# Altium PCB DebugBoard.PcbDoc
Units mil, origin at the board's own origin, x right, y up, seen from the top; angles counter-clockwise.
Board outline 2401.57 x 4330.71 mil, 4 copper layers (Top Layer, Layer 1, Layer 2, Bottom Layer), stack 70.112 mil thick; 162 components, 98 nets, 496 pads, 16 vias.
Unrouted connection lines stored in the file: 369.
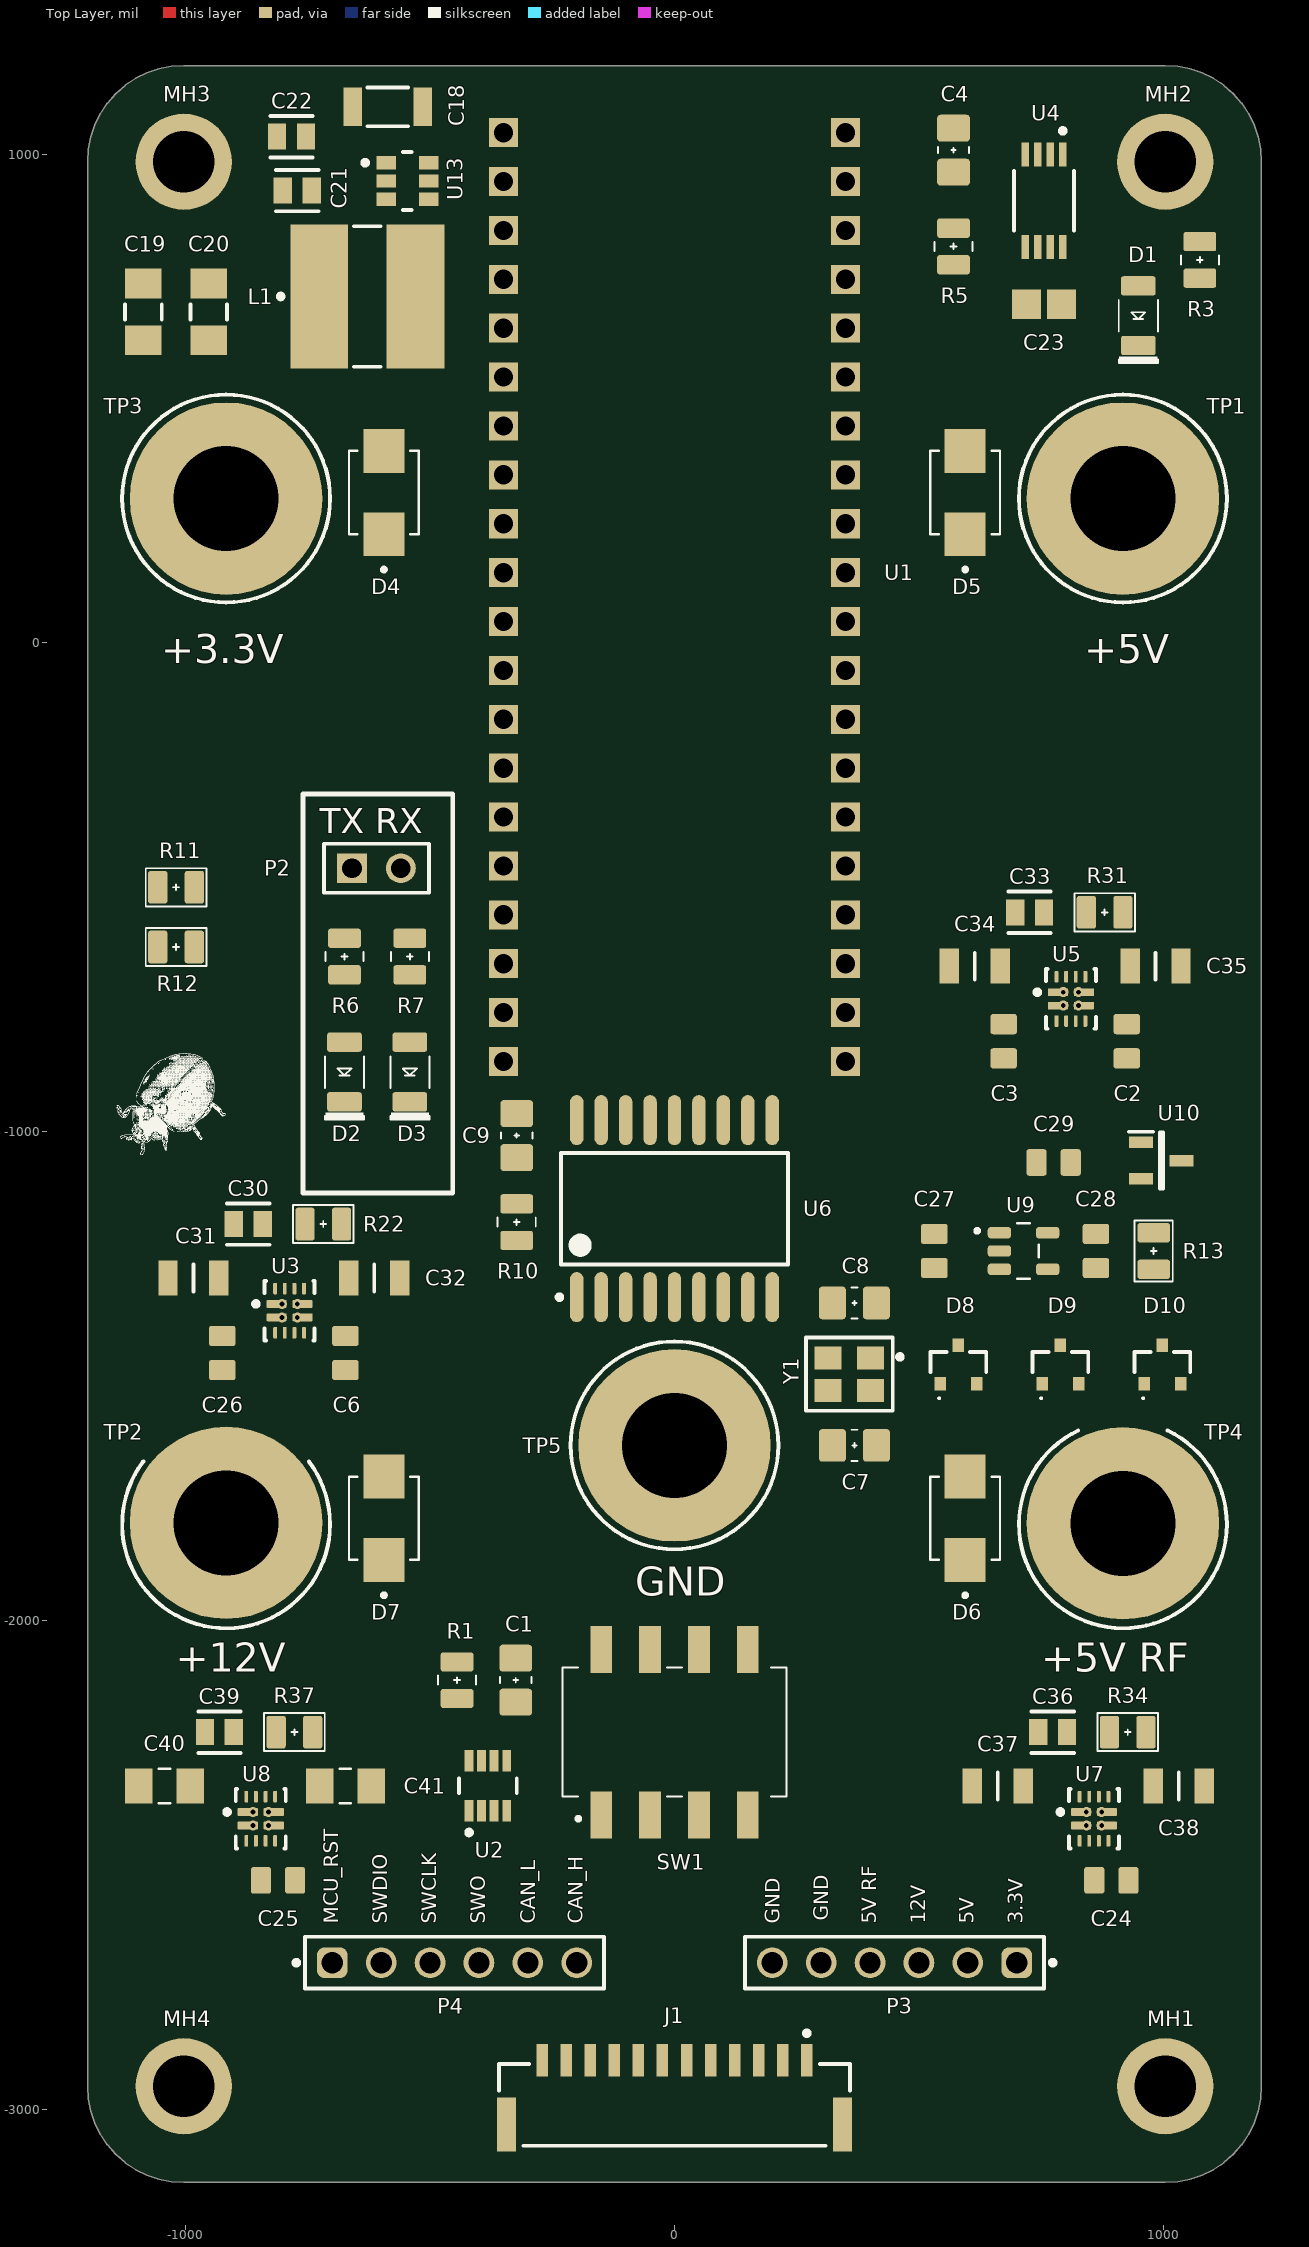
[diagram p0: Top Layer view]
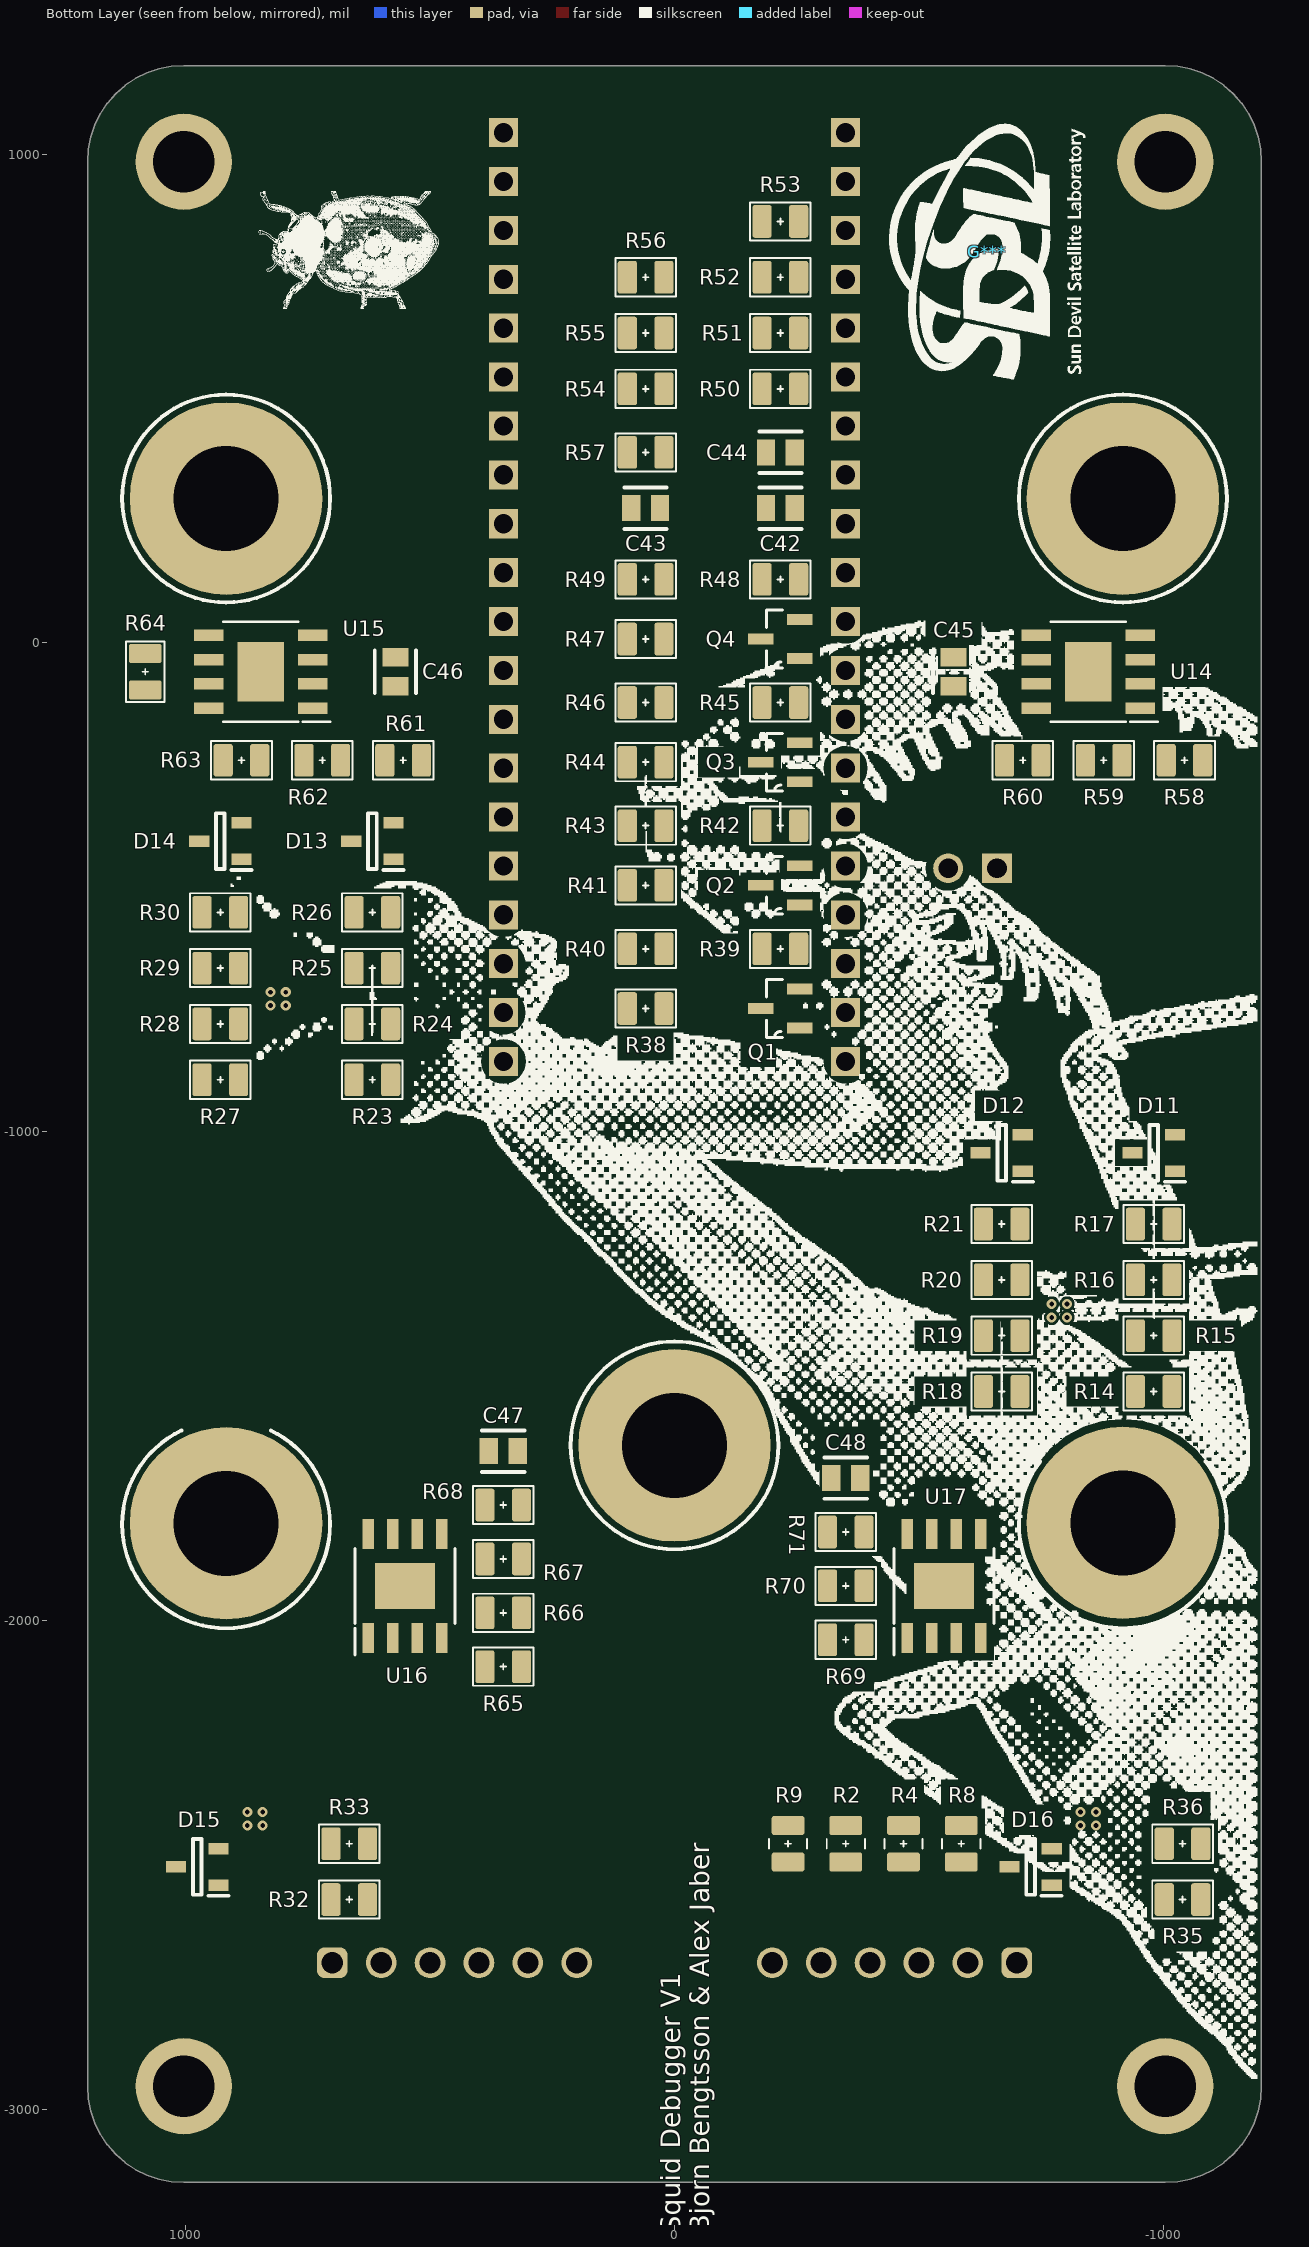
[diagram p1: Bottom Layer view, seen from below]

## Layer stack, top to bottom
Top Solder: solder mask 0.5, Solder Resist, Dk 3.3
Top Layer: signal copper 1.378
Dielectric 1: prepreg 2.8, PP-006, Dk 4.1
Layer 1: signal copper 1.378
Dielectric1: core 59, FR-4, Dk 4.3
Layer 2: signal copper 1.378
Dielectric 2: prepreg 2.8, PP-006, Dk 4.1
Bottom Layer: signal copper 1.378
Bottom Solder: solder mask 0.5, Solder Resist, Dk 3.3

## Board outline
1003.94,1181.15 -1003.94,1181.15 -1029.63,1179.47 -1054.89,1174.45 -1079.27,1166.17 -1102.36,1154.78 -1123.77,1140.48 -1143.13,1123.5 -1160.11,1104.14 -1174.41,1082.73 -1185.8,1059.63 -1194.08,1035.25 -1199.1,1010 -1200.79,984.3 -1200.79,-2952.7 -1199.1,-2978.4 -1194.08,-3003.65 -1185.8,-3028.04 -1174.41,-3051.13 -1160.11,-3072.54 -1143.13,-3091.9 -1123.77,-3108.88 -1102.36,-3123.18 -1079.27,-3134.57 -1054.89,-3142.85 -1029.63,-3147.87 -1003.94,-3149.56 1003.94,-3149.56 1029.63,-3147.87 1054.89,-3142.85 1079.27,-3134.57 1102.36,-3123.18 1123.77,-3108.88 1143.13,-3091.9 1160.11,-3072.54 1174.41,-3051.13 1185.8,-3028.04 1194.08,-3003.65 1199.1,-2978.4 1200.79,-2952.7 1200.79,984.3 1199.1,1010 1194.08,1035.25 1185.8,1059.63 1174.41,1082.73 1160.11,1104.14 1143.13,1123.5 1123.77,1140.48 1102.36,1154.78 1079.27,1166.17 1054.89,1174.45 1029.63,1179.47

## Design rules (kind name [scope] priority, off if disabled: settings)
Clearance [All] p1: gap=5 ignorepadtopadclearanceinfootprint=FALSE
DiffPairsRouting [All] p1: maxlimit=10 minlimit=10 mostfreqgap=10 toplayer_minwidth=10 toplayer_maxwidth=10 toplayer_prefwidth=10 midlayer1_minwidth=10 midlayer1_maxwidth=10 midlayer1_prefwidth=10 midlayer2_minwidth=10 midlayer2_maxwidth=10 midlayer2_prefwidth=10 bottomlayer_minwidth=10 bottomlayer_maxwidth=10 bottomlayer_prefwidth=10 maxuncoupledlength=500
HoleSize [All] p1: absolutevalues=TRUE maxlimit=500 minlimit=8 maxpercent=80.000 minpercent=20.000
MinimumAnnularRing [All] p1: minimumring=5
MinimumSolderMaskSliver [All] p1: minsoldermaskwidth=5
PasteMaskExpansion [All] p1: expansion=10
PlaneClearance [All] p1: clearance=15
PlaneConnect [All] p1: pad.planeconnectstyle=Relief pad.reliefexpansion=20 pad.reliefentries=4 pad.reliefconductorwidth=10 pad.reliefairgap=10 via.planeconnectstyle=Direct via.reliefexpansion=20 via.reliefentries=4 via.reliefconductorwidth=10 via.reliefairgap=10
PolygonConnect [All] p1: thpad.connectstyle=Direct thpad.reliefconductorwidth=10 thpad.reliefentries=4 thpad.polygonreliefangle="90 Angle" thpad.airgapwidth=10 smdpad.connectstyle=Relief smdpad.reliefconductorwidth=10 smdpad.reliefentries=4 smdpad.polygonreliefangle="90 Angle" smdpad.airgapwidth=10 via.connectstyle=Direct via.reliefconductorwidth=10 via.reliefentries=4 via.polygonreliefangle="90 Angle" via.airgapwidth=10
RoutingVias [All] p1: holewidth=12 width=24 viastyle="Through Hole" minholewidth=6 minwidth=12 maxholewidth=20 maxwidth=48
SMDNeckDown [All] p1: percent=120.000
SilkToSilkClearance [All] p1: silktosilkclearance=5
SilkToSolderMaskClearance SilkscreenOverComponentPads [IsPad] p1: minsilkscreentomaskgap=1 clearancetoexposedcopper=TRUE
SolderMaskExpansion [All] p1: expansion=10 istentingtop=FALSE
SupplyNets "Schematic Supply Nets_4" [InNet('+5V_LIM')] p1: voltage=0.000
SupplyNets "Schematic Supply Nets_2" [InNet('+5V_RF_LIM')] p2: voltage=0.000
SupplyNets "Schematic Supply Nets_1" [InNet('+3V3_LIM')] p3: voltage=0.000
SupplyNets "Schematic Supply Nets" [InNet('+12V_LIM')] p4: voltage=0.000
SupplyNets "Schematic Supply Nets_23" [InNet('+5V_PSU')] p5: voltage=0.000
SupplyNets "Schematic Supply Nets_22" [InNet('+3V3_USB')] p6: voltage=0.000
SupplyNets "Schematic Supply Nets_21" [InNet('VAUX')] p7: voltage=0.000
SupplyNets "Schematic Supply Nets_20" [InNet('+5V_RF_PSU')] p8: voltage=0.000
SupplyNets "Schematic Supply Nets_19" [InNet('+3V3_PSU')] p9: voltage=0.000
SupplyNets "Schematic Supply Nets_18" [InNet('+3V3_AUX')] p10: voltage=0.000
SupplyNets "Schematic Supply Nets_17" [InNet('+VBUS_PROT')] p11: voltage=0.000
SupplyNets "Schematic Supply Nets_16" [InNet('XREF_2V5')] p12: voltage=0.000
SupplyNets "Schematic Supply Nets_15" [InNet('+5V_TGT')] p13: voltage=0.000
SupplyNets "Schematic Supply Nets_14" [InNet('+3V3_TGT')] p14: voltage=0.000
SupplyNets "Schematic Supply Nets_13" [InNet('+12V_TGT')] p15: voltage=0.000
SupplyNets "Schematic Supply Nets_12" [InNet('+12V_PSU')] p16: voltage=0.000
SupplyNets "Schematic Supply Nets_11" [InNet('+5V_RF_TGT')] p17: voltage=0.000
SupplyNets "Schematic Supply Nets_10" [InNet('+3V3_RPI')] p18: voltage=0.000
SupplyNets "Schematic Supply Nets_9" [InNet('+VBUS')] p19: voltage=0.000
SupplyNets "Schematic Supply Nets_3" [InNet('GND')] p20: voltage=0.000
Width "2A Routing" [InNet('+5V','+12V','+5V BNN', '+5V RF', '+3.3V BNN', '+3.3V')] p1: maxlimit=55 minlimit=21 preferedwidth=55 toplayer_maxwidth=25 toplayer_prefwidth=25 midlayer1_minwidth=53 midlayer2_minwidth=53 bottomlayer_maxwidth=25 bottomlayer_prefwidth=25 minimp=50.000000 maximp=50.000000 favimp=50.000000
Width "1A Routing" [InNet('+3.3V RPI', '+VBUS', '+VBUS_O')] p2: maxlimit=25 minlimit=10 preferedwidth=25 toplayer_maxwidth=10 toplayer_prefwidth=10 midlayer1_minwidth=22 midlayer2_minwidth=22 bottomlayer_maxwidth=10 bottomlayer_prefwidth=10 minimp=50.000000 maximp=50.000000 favimp=50.000000
Width [All] p3: maxlimit=10 minlimit=10 preferedwidth=10
22 further rules are at their usual default settings.

## Classes and differential pairs
component class DebugBoardLimiters: C45 C46 C47 C48 R58 R59 R60 R61 R62 R63 R64 R65 R66 R67 R68 R69 R70 R71 U14 U15 U16 U17
component class DebugBoardPowerControl: C42 C43 C44 Q1 Q2 Q3 Q4 R38 R39 R40 R41 R42 R43 R44 R45 R46 R47 R48 R49 R50 R51 R52 R53 R54 R55 R56 R57 SW1
component class DebugBoardMuxes: C24 C25 C27 C28 C29 C36 C37 C38 C39 C40 C41 D4 D5 D6 D7 D8 D9 D10 D15 D16 R13 R32 R33 R34 R35 R36 R37 U7 U8 U9 U10
component class DebugBoard5VMux: C2 C3 C33 C34 C35 D13 D14 R23 R24 R25 R26 R27 R28 R29 R30 R31 U5
component class DebugBoard3V3Mux: C6 C26 C30 C31 C32 D11 D12 R14 R15 R16 R17 R18 R19 R20 R21 R22 U3
component class DebugBoard: C1 C4 C7 C8 C9 C18 C19 C20 C21 C22 C23 D1 D2 D3 J1 L1 MH1 MH2 MH3 MH4 P2 P3 P4 R1 R2 R3 R4 R5 R6 R7 R8 R9 R10 R11 R12 TP1 TP2 TP3 TP4 TP5 U1 U2 U4 U6 U13 Y1

## Components (designator, comment, footprint, x,y, rotation, side; value= is the part's Value field where it differs from the comment)
C1 "100nf" CAP_0805 -324.8,-2122 r90 top
C2 "1uF 25V" CAPC2012X135N 925.2,-814.91 r90 top
C3 "1uF 25V" CAPC2012X135N 673.23,-814.91 r90 top
C4 "100nf" CAP_0805 570.87,1007.93 r90 top
C6 "1uF 25V" CAPC2012X135N -673.23,-1452.7 r90 top
C7 "22pf" CAP_0805 368.11,-1641.68 r0 top
C8 "22pf" CAP_0805 368.11,-1350.34 r0 top
C9 "100nf" CAP_0805 -322.83,-1007.82 r90 top
C18 "10uf" FP-CGA5L-0_3-0_1-IPC_A -586.61,1096.51 r0 top
C19 "22uf" FP-GCM31C-0_2-e0_3_0_8-IPC_A -1086.61,677.22 r90 top
C20 "22uf" FP-GCM31C-0_2-e0_3_0_8-IPC_A -952.76,677.22 r90 top
C21 "0.1uF" FP-C0805C-DN-MFG -771.65,925.25 r0 top value="0.10 μF"
C22 "0.1uF" FP-C0805C-DN-MFG -783.46,1035.48 r0 top value="0.10 μF"
C23 "1 uF" CAPC2013X145X50ML20T25 755.91,692.96 r0 top value=1µF
C24 "1uF 25V" CAPC2012X135N 893.7,-2531.44 r0 top
C25 "1uF 50V" CAPC2012X135N -811.02,-2531.44 r0 top
C26 "1uF 25V" CAPC2012X135N -925.2,-1452.7 r90 top
C27 "1uF 50V" CAPC2012X135N 531.5,-1244.04 r90 top
C28 "1uF 25V" CAPC2012X135N 862.2,-1244.04 r90 top
C29 "1uF 25V" CAPC2012X135N 775.59,-1062.94 r0 top
C30 "100nF" FP-C0805C-DN-MFG -872.05,-1188.93 r0 top value="0.10 μF"
C31 "22uF 10V" CAPC3116X180N -984.25,-1299.16 r0 top
C32 "22uF 10V" CAPC3116X180N -614.17,-1299.16 r0 top
C33 "100nF" FP-C0805C-DN-MFG 726.38,-551.13 r0 top value="0.10 μF"
C34 "22uF 10V" CAPC3116X180N 614.17,-661.37 r0 top
C35 "22uF 10V" CAPC3116X180N 984.25,-661.37 r0 top
C36 "100nF" FP-C0805C-DN-MFG 773.62,-2228.3 r0 top value="0.10 μF"
C37 "22uF 10V" CAPC3116X180N 661.42,-2338.53 r0 top
C38 "22uF 10V" CAPC3116X180N 1031.5,-2338.53 r0 top
C39 "100nF" FP-C0805C-DN-MFG -931.1,-2228.3 r0 top value="0.10 μF"
C40 "10uF 35V" CAPC3216X190N -1043.31,-2338.53 r0 top
C41 "10uF 35V" CAPC3216X190N -673.23,-2338.53 r0 top
C42 "100nF" FP-C0805C-DN-MFG -216.54,275.64 r0 bottom value="0.10 μF"
C43 "100nF" FP-C0805C-DN-MFG 59.06,275.64 r0 bottom value="0.10 μF"
C44 "100nF" FP-C0805C-DN-MFG -216.54,389.81 r0 bottom value="0.10 μF"
C45 "100nF" FP-C0805C-DN-MFG -570.87,-59 r90 bottom value="0.10 μF"
C46 "100nF" FP-C0805C-DN-MFG 570.87,-59 r90 bottom value="0.10 μF"
C47 "100nF" FP-C0805C-DN-MFG 350.39,-1653.49 r0 bottom value="0.10 μF"
C48 "100nF" FP-C0805C-DN-MFG -350.39,-1708.61 r0 bottom value="0.10 μF"
D1 "LED_1206_RED" LED_1206_RED 948.82,669.38 r90 top
D2 "LED_1206_RED" LED_1206_RED -675.2,-877.86 r90 top
D3 "LED_1206_RED" LED_1206_RED -541.34,-877.86 r90 top
D4 "SMBJ5.0A" DIOM4336X265N -594.49,307.53 r90 top
D5 "SMBJ5.0A" DIOM4336X265N 594.49,307.53 r90 top
D6 "SMBJ5.0A" DIOM4336X265N 594.49,-1790.89 r90 top
D7 "SMBJ13A" DIOM4336X265N -594.49,-1790.89 r90 top
D8 "BAT54C" BAT54C215 580.71,-1476.33 r0 top
D9 "BAT54C" BAT54C215 789.37,-1476.33 r0 top
D10 "BAT54C" BAT54C215 998.03,-1476.33 r0 top
D11 "BZX84-C4V7" SOT95P230X110-3N -980.31,-1043.26 r0 bottom
D12 "BAT54A" SOT95P230X110-3N -669.29,-1043.26 r0 bottom
D13 "BZX84-C4V7" SOT95P230X110-3N 618.11,-405.46 r0 bottom
D14 "BAT54A" SOT95P230X110-3N 929.13,-405.46 r0 bottom
D15 "BAT54A" SOT95P230X110-3N 976.38,-2503.89 r0 bottom
D16 "BAT54A" SOT95P230X110-3N -728.35,-2503.89 r0 bottom
G*** "LOGO" SDSLLOGO -639.82,800.37 r270 bottom
J1 "7347c7e790388373890d2c5be27f0b5" FP-BM12B-GHS-TBT_LF_SN-MFG 0,-2990.89 r0 top
L1 "3.9UH" WE-PD2SR_7850 49371.54,50708.71 r0 top
MH1 "CCNT-1U-MH1" CCNT-1U-MH1-Footprint-1 1003.94,-2952.7 r0 top locked
MH2 "CCNT-1U-MH1" CCNT-1U-MH1-Footprint-1 1003.94,984.3 r0 top locked
MH3 "CCNT-1U-MH1" CCNT-1U-MH1-Footprint-1 -1003.94,984.3 r0 top locked
MH4 "CCNT-1U-MH1" CCNT-1U-MH1-Footprint-1 -1003.94,-2952.7 r0 top locked
P2 "CMP-1024-00329-1" SMTC-TSW-102-26-XX-S -659.84,-460.97 r0 top
P3 "61300611121" 61300611121 450,-2699.95 r180 top
P4 "61300611121" 61300611121 -450,-2699.95 r0 top
Q1 "2N7002-7-F" SOT103P240X110-3N -216.54,-747.98 r0 bottom
Q2 "2N7002-7-F" SOT103P240X110-3N -216.54,-496.01 r0 bottom
Q3 "2N7002-7-F" SOT103P240X110-3N -216.54,-244.04 r0 bottom
Q4 "2N7002-7-F" SOT103P240X110-3N -216.54,7.93 r0 bottom
R1 "10K" RES_0805 -444.88,-2122 r90 top
R2 "100" RES_0805 -350.39,-2456.64 r90 bottom
R3 "260" RES_0805 1074.8,783.52 r90 top
R4 "100" RES_0805 -468.5,-2456.64 r90 bottom
R5 "576" RES_0805 570.87,811.07 r270 top
R6 "2.2k" RES_0805 -675.2,-641.68 r90 top
R7 "2.2k" RES_0805 -541.34,-641.68 r90 top
R8 "100" RES_0805 -586.61,-2456.64 r90 bottom
R9 "1k" RES_0805 -232.28,-2456.64 r90 bottom
R10 "10K" RES_0805 -322.83,-1184.99 r90 top
R11 "100" RES_0805 -1019.68,-499.95 r0 top
R12 "1k" RES_0805 -1019.68,-622 r0 top
R13 "2.00k" RES_0805 980.32,-1244.04 r90 top
R14 "2.10k" RES_0805 -980.31,-1531.44 r0 bottom
R15 "10.0k" RES_0805 -980.31,-1417.27 r0 bottom
R16 "54.9k" RES_0805 -980.31,-1303.1 r0 bottom
R17 "10.0k" RES_0805 -980.31,-1188.93 r0 bottom
R18 "26.1k" RES_0805 -669.29,-1531.44 r0 bottom
R19 "10.0k" RES_0805 -669.29,-1417.27 r0 bottom
R20 "26.1k" RES_0805 -669.29,-1303.1 r0 bottom
R21 "10.0k" RES_0805 -669.29,-1188.93 r0 bottom
R22 "100k" RES_0805 -718.5,-1188.93 r0 top
R23 "8.25k" RES_0805 618.11,-893.65 r0 bottom
R24 "10.0k" RES_0805 618.11,-779.48 r0 bottom
R25 "150k" RES_0805 618.11,-665.3 r0 bottom
R26 "10.0k" RES_0805 618.11,-551.13 r0 bottom
R27 "44.2k" RES_0805 929.13,-893.65 r0 bottom
R28 "10.0k" RES_0805 929.13,-779.48 r0 bottom
R29 "44.2k" RES_0805 929.13,-665.3 r0 bottom
R30 "10.0k" RES_0805 929.13,-551.13 r0 bottom
R31 "100k" RES_0805 879.92,-551.13 r0 top
R32 "44.2k" RES_0805 665.35,-2570.81 r0 bottom
R33 "10.0k" RES_0805 665.35,-2456.64 r0 bottom
R34 "100k" RES_0805 927.17,-2228.3 r0 top
R35 "118k" RES_0805 -1039.37,-2570.81 r0 bottom
R36 "10.0k" RES_0805 -1039.37,-2456.64 r0 bottom
R37 "100k" RES_0805 -777.56,-2228.3 r0 top
R38 "4.7k" RES_0805 59.06,-747.98 r0 bottom
R39 "100R" RES_0805 -216.54,-625.93 r0 bottom
R40 "100k" RES_0805 59.06,-625.93 r0 bottom
R41 "4.7k" RES_0805 59.06,-496.01 r0 bottom
R42 "100R" RES_0805 -216.54,-373.96 r0 bottom
R43 "100k" RES_0805 59.06,-373.96 r0 bottom
R44 "4.7k" RES_0805 59.06,-244.04 r0 bottom
R45 "100R" RES_0805 -216.54,-122 r0 bottom
R46 "100k" RES_0805 59.06,-122 r0 bottom
R47 "4.7k" RES_0805 59.06,7.93 r0 bottom
R48 "100R" RES_0805 -216.54,129.97 r0 bottom
R49 "100k" RES_0805 59.06,129.97 r0 bottom
R50 "49.9k" RES_0805 -216.54,519.74 r0 bottom
R51 "100k" RES_0805 -216.54,633.91 r0 bottom
R52 "100k" RES_0805 -216.54,748.08 r0 bottom
R53 "100k" RES_0805 -216.54,862.26 r0 bottom
R54 "470k" RES_0805 59.06,519.74 r0 bottom
R55 "100k" RES_0805 59.06,633.91 r0 bottom
R56 "100k" RES_0805 59.06,748.08 r0 bottom
R57 "100k" RES_0805 59.06,389.81 r0 bottom
R58 "100k" RES_0805 -1043.31,-240.11 r0 bottom
R59 "100k" RES_0805 -877.95,-240.11 r0 bottom
R60 "1.02k" RES_0805 -712.6,-240.11 r0 bottom
R61 "100k" RES_0805 555.12,-240.11 r0 bottom
R62 "100k" RES_0805 720.47,-240.11 r0 bottom
R63 "1.02k" RES_0805 885.83,-240.11 r0 bottom
R64 "402k" RES_0805 1082.68,-59 r90 bottom
R65 "100k" RES_0805 350.39,-2094.44 r0 bottom
R66 "100k" RES_0805 350.39,-1984.2 r0 bottom
R67 "1.02k" RES_0805 350.39,-1873.96 r0 bottom
R68 "402k" RES_0805 350.39,-1763.73 r0 bottom
R69 "470k" RES_0805 -350.39,-2039.32 r0 bottom
R70 "100k" RES_0805 -350.39,-1929.08 r0 bottom
R71 "1.02k" RES_0805 -350.39,-1818.85 r0 bottom
SW1 "219-4MST" 2194MST 0,-2228.3 r0 top
TP1 "575-4" KSTN-575-4#1 917.32,295.33 r0 top
TP2 "575-4" KSTN-575-4#2 -917.32,-1803.1 r0 top
TP3 "575-4" KSTN-575-4#1 -917.32,295.33 r0 top
TP4 "575-4" KSTN-575-4#3 917.32,-1803.1 r0 top
TP5 "575-4" KSTN-575-4#1 0,-1641.68 r0 top
U1 "RASPBERRY_PI_PICO" RASPBERRY_PI_PICO 0,143.75 r0 top
U2 "TCAN330GDCNR" FP-DCN0008A-MFG -381.89,-2338.06 r90 top
U3 "TPS2121RUXR" FP-RUX0012A-MFG -787.4,-1366.09 r0 top
U4 "MIC2544-1YMM-TR" FP-MSOP-8LD-PL-1-MFG 755.91,904.66 r270 top value=120mΩ
U5 "TPS2121RUXR" FP-RUX0012A-MFG 811.02,-728.3 r0 top
U6 "MCP2515" SOIC-SO18_M 0,-1157.43 r90 top
U7 "TPS2121RUXR" FP-RUX0012A-MFG 858.27,-2405.46 r0 top
U8 "TPS2121RUXR" FP-RUX0012A-MFG -846.46,-2405.46 r0 top
U9 "TLV70433DBVR" SOT95P280X145-5N 714.06,-1244.04 r0 top
U10 "LM4040BIM3-2.5" SOT95P237X112-3N 996.06,-1059 r0 top
U13 "AP63203WU-7" FP-TSOT26-MFG -546.26,944.93 r0 top
U14 "TPS259621DDAR" SOIC127P600X170-9N -846.46,-59 r0 bottom value=120mΩ
U15 "TPS259621DDAR" SOIC127P600X170-9N 846.46,-59 r0 bottom value=120mΩ
U16 "TPS259621DDAR" SOIC127P600X170-9N 551.18,-1929.08 r90 bottom value=120mΩ
U17 "TPS259621DDAR" SOIC127P600X170-9N -551.18,-1929.08 r90 bottom value=120mΩ
Y1 "7M-16.000MAHL-T" FP-7M-MFG 357.76,-1496.01 r180 top

## Footprints (in the part's own frame and the unit in brackets; to place one, negate y for a bottom-side part, rotate by r counter-clockwise, add the part's x,y. Pads: shape width x height; smd on the part's side, far side on the other; paste and mask are expansions set on the pad)
2194MST [mm]
  rect 1.13x2.44 smd: 1(-3.81,-4.3) 2(-1.27,-4.3) 3(1.27,-4.3) 4(3.81,-4.3) 5(3.81,4.3) 6(1.27,4.3) 7(-1.27,4.3) 8(-3.81,4.3)
  silkscreen extent -5.81,-4.6 5.81,3.35, body extent -5.81,-4.95 5.81,4.95, height 4.27
61300611121 [mm] "Pin Header, pitch 2.54 mm, THT, Vertical, single row, 6p"
  rrect50% 1.6x1.6 hole 1.1: 1(-6.35,0)
  round 1.6 hole 1.1: 2(-3.81,0) 3(-1.27,0) 4(1.27,0) 5(3.81,0) 6(6.35,0)
  silkscreen extent -8.34,-1.35 7.77,1.35, body extent -7.62,-1.27 7.62,1.27, height 8.57
BAT54C215 [mm]
  rect 0.6x0.7 smd: 1(-0.95,-1) 2(0.95,-1) 3(0,1)
  silkscreen extent -1.45,-1.8 1.45,0.65, body extent -1.45,-1.2 1.45,1.2, height 0.95
CAP_0805 [mm] "CAP_0805"
  rrect25% 1.4x1.7 smd: 1(-1.143,0) 2(1.143,0)
  silkscreen extent -0.16,-0.81 0.16,0.81, body extent -1.15,-0.76 1.15,0.79, height 1.01
CAPC2012X135N [mm]
  rrect25% 1.05x1.38 smd: 1(-0.888,0) 2(0.888,0)
  body extent -1,-0.63 1,0.63, height 1.35
CAPC2013X145X50ML20T25 [mm] "Chip Capacitor, 2-Leads, Body 2.2x1.45mm, IPC Low Density"
  rect 1.5x1.55 smd: 1(-0.9,0) 2(0.9,0)
  body extent -1.1,-0.72 1.1,0.73, height 1.45
CAPC3116X180N [mm]
  rect 1.01x1.82 smd: 1(-1.32,0) 2(1.32,0)
  silkscreen extent 0,-0.7 0,0.7, body extent -1.55,-0.8 1.55,0.8, height 1.8
CAPC3216X190N [mm]
  rect 1.44x1.82 smd: 1(-1.336,0) 2(1.336,0)
  silkscreen extent -0.29,-0.9 0.29,0.9, body extent -1.6,-0.8 1.6,0.8, height 1.9
CCNT-1U-MH1-Footprint-1 [mm]
  round 5 hole 3.2 paste-2539.97 mask+0: MH1(0,0)
DIOM4336X265N [mm]
  rect 2.28x2.12 smd: A(2.165,0) C(-2.165,0)
  silkscreen extent -4.1,-1.81 2.16,1.81, body extent -2.67,-1.81 2.67,1.81, height 2.65
FP-7M-MFG [mm]
  rect 1.4x1.2 smd paste+0 mask+0: 1(-1.1,-0.85) 2(1.1,-0.85) 3(1.1,0.85) 4(-1.1,0.85)
  silkscreen extent -2.75,-1.9 2.25,1.9, body extent -1.9,-1.55 1.9,1.55, height 0.25
FP-BM12B-GHS-TBT_LF_SN-MFG [mm]
  rect 0.6x1.7 smd paste+0 mask+0: 1(6.875,2.325) 2(5.625,2.325) 3(4.375,2.325) 4(3.125,2.325) 5(1.875,2.325) 6(0.625,2.325) 7(-0.625,2.325) 8(-1.875,2.325) 9(-3.125,2.325) 10(-4.375,2.325) 11(-5.625,2.325) 12(-6.875,2.325)
  rect 1x2.8 smd paste+0 mask+0: 13(-8.725,-1.025) 14(8.725,-1.025)
  silkscreen extent -9.13,-2.12 9.13,3.85, body extent -9.13,-2.13 9.13,2.83, height 4.05
FP-C0805C-DN-MFG [mm]
  rect 0.95x1.35 smd paste+0 mask+0: 1(-0.75,0) 2(0.75,0)
  silkscreen extent -1.1,-1.07 1.1,1.07, body extent -1.4,-0.85 1.4,0.85, height 0.25
FP-CGA5L-0_3-0_1-IPC_A [mm]
  rect 0.956x2.006 smd paste+0 mask+0: 1(-1.825,0) 2(1.825,0)
  silkscreen extent -1.05,-1 1.05,1, body extent -2.8,-1.5 2.8,1.5, height 0.25
FP-DCN0008A-MFG [mm]
  rect 1.1x0.45 smd paste+0 mask+0: 1(-1.3,0.975) 2(-1.3,0.325) 3(-1.3,-0.325) 4(-1.3,-0.975) 5(1.3,-0.975) 6(1.3,-0.325) 7(1.3,0.325) 8(1.3,0.975)
  silkscreen extent -2.55,-1.5 0.38,1.5, body extent -1.95,-1.85 1.95,1.85, height 0.25
FP-GCM31C-0_2-e0_3_0_8-IPC_A [mil]
  rect 61.21x75.05 smd paste+0 mask+0: 1(-58.1,0) 2(58.1,0)
  silkscreen extent -16,-38 16,38, body extent -108,-57 108,57, height 10
FP-MSOP-8LD-PL-1-MFG [mm]
  rect 1.26x0.4 smd paste+0 mask+0: 1(-2.4,0.975) 2(-2.4,0.325) 3(-2.4,-0.325) 4(-2.4,-0.975) 5(2.4,-0.975) 6(2.4,-0.325) 7(2.4,0.325) 8(2.4,0.975)
  silkscreen extent -3.75,-1.55 1.55,1.55, body extent -3.13,-1.85 3.13,1.85, height 0.25
FP-RUX0012A-MFG [mm]
  rrect25% 1.05x0.4 smd paste+0 mask+0: 1(-0.675,0.35) 2(-0.675,-0.35) 7(0.675,-0.35) 8(0.675,0.35)
  rrect50% 0.2x0.6 smd paste+0 mask+0: 3(-0.75,-1.15) 4(-0.25,-1.15) 5(0.25,-1.15) 6(0.75,-1.15) 9(0.75,1.15) 10(0.25,1.15) 11(-0.25,1.15) 12(-0.75,1.15)
  silkscreen extent -1.87,-1.55 1.3,1.55, body extent -1.3,-1.55 1.3,1.55, height 0.25
FP-TSOT26-MFG [mm]
  rect 1x0.7 smd paste+0 mask+0: 1(-1.099,0.95) 2(-1.099,0) 3(-1.099,-0.95) 4(1.099,-0.95) 5(1.099,0) 6(1.099,0.95)
  silkscreen extent -2.32,-1.5 0.22,1.5, body extent -1.7,-1.6 1.7,1.6, height 0.25
KSTN-575-4#1 [mm] "Banana Jack, Non-Insulated, Dia 7.92mm"
  round 10 hole 5.45: 1(0,0)
  silkscreen extent -5.4,-5.4 5.4,5.4, body extent -3.98,-3.96 3.92,3.94, height 2.36
KSTN-575-4#2 [mm] "Banana Jack, Non-Insulated, Dia 7.92mm"
  round 10 hole 5.45: 1(0,0.076)
  silkscreen extent -5.4,-5.4 5.4,3.27, body extent -3.98,-3.96 3.92,3.94, height 2.36
KSTN-575-4#3 [mm] "Banana Jack, Non-Insulated, Dia 7.92mm"
  round 10 hole 5.45 paste-2539.97 mask-2539.97: 1(0,0.051)
  silkscreen extent -5.4,-5.4 5.4,4.88, body extent -3.98,-3.96 3.92,3.94, height 2.36
LED_1206_RED [mm]
  rrect25% 1x1.8 smd: A(1.55,0) K(-1.55,0)
  silkscreen extent -2.46,-1.02 0.82,1.02, body extent -1.64,-0.84 1.64,0.81, height 0.9
RASPBERRY_PI_PICO [mm]
  rect 1.508x1.508 / inner round 1.508 / far side rect 1.508x1.508 hole 1: 3V3(8.89,12.7) 3V3_EN(8.89,15.24) ADC_VREF(8.89,10.16) AGND(8.89,5.08) GND(8.89,17.78) GND2(8.89,-7.62) GND3(8.89,-20.32) GND4(-8.89,17.78) GND5(-8.89,5.08) GND6(-8.89,-7.62) GND7(-8.89,-20.32) GP0(-8.89,22.86) GP1(-8.89,20.32) GP2(-8.89,15.24) GP3(-8.89,12.7) GP4(-8.89,10.16) GP5(-8.89,7.62) GP6(-8.89,2.54) GP7(-8.89,0) GP8(-8.89,-2.54) GP9(-8.89,-5.08) GP10(-8.89,-10.16) GP11(-8.89,-12.7) GP12(-8.89,-15.24) GP13(-8.89,-17.78) GP14(-8.89,-22.86) GP15(-8.89,-25.4) GP16(8.89,-25.4) GP17(8.89,-22.86) GP18(8.89,-17.78) GP19(8.89,-15.24) GP20(8.89,-12.7) GP21(8.89,-10.16) GP22(8.89,-5.08) GP26_A0(8.89,0) GP27_A1(8.89,2.54) GP28_A2(8.89,7.62) RUN(8.89,-2.54) VBUS(8.89,22.86) VSYS(8.89,20.32)
  body extent -10.5,-26.77 10.5,25.53, height 3.73
RES_0805 [mm]
  rrect25% 1x1.7 smd: 1(-0.95,0) 2(0.95,0)
  silkscreen extent -0.24,-0.99 0.24,0.99, body extent -1,-0.6 1,0.6, height 0.55
SDSLLOGO [mil]
  silkscreen extent -261,-200 261,200
SMTC-TSW-102-26-XX-S [mm] ".025 SQ Post Terminal Strip Assembly, 1x2 Pins, Vertical, 2.54mm Pitch, Male"
  rect 1.55x1.55 hole 1.02: 1(0,0)
  round 1.55 hole 1.02: 2(2.54,0)
  silkscreen extent -1.46,-1.27 4,1.27, body extent -1.4,-1.27 3.81,1.27, height 8.38
SOIC127P600X170-9N [mm] "HSOIC-8 (TI DDA) with thermal pad, 1.27 mm pitch, 6.0 mm lead span"
  rect 1.55x0.6 smd: 1(-2.7,1.905) 2(-2.7,0.635) 3(-2.7,-0.635) 4(-2.7,-1.905) 5(2.7,-1.905) 6(2.7,-0.635) 7(2.7,0.635) 8(2.7,1.905)
  rect 2.4x3.1 smd: 1(0,0)
  silkscreen extent -3.6,-2.6 1.95,2.6, body extent -3,-2.45 3,2.45, height 1.72
SOIC-SO18_M [mm]
  oval 2.6x0.7 smd: 1(-4.6,5.08) 2(-4.6,3.81) 3(-4.6,2.54) 4(-4.6,1.27) 5(-4.6,0) 6(-4.6,-1.27) 7(-4.6,-2.54) 8(-4.6,-3.81) 9(-4.6,-5.08) 10(4.6,-5.08) 11(4.6,-3.81) 12(4.6,-2.54) 13(4.6,-1.27) 14(4.6,0) 15(4.6,1.27) 16(4.6,2.54) 17(4.6,3.81) 18(4.6,5.08)
  silkscreen extent -4.72,-5.9 2.9,6.1, body extent -3.8,-5.87 3.8,5.87, height 2.65
SOT95P230X110-3N [mm]
  rect 1.05x0.6 smd: 1(-1.1,0.95) 2(-1.1,-0.95) 3(1.1,0)
  silkscreen extent -1.63,-1.45 0.23,1.5, body extent -1.2,-1.45 1.2,1.45, height 0.95
SOT95P237X112-3N [mm]
  rect 1.25x0.6 smd: 1(-1.05,0.95) 2(-1.05,-0.95) 3(1.05,0)
  silkscreen extent -1.68,-1.46 0.08,1.5, body extent -1.27,-1.46 1.27,1.46, height 1
SOT95P280X145-5N [mm]
  rrect50% 1.21x0.59 smd: 1(-1.255,0.95) 2(-1.255,0) 3(-1.255,-0.95) 4(1.255,-0.95) 5(1.255,0.95)
  silkscreen extent -2.51,-1.45 0.8,1.45, body extent -1.4,-1.45 1.4,1.45, height 1.45
SOT103P240X110-3N [mil]
  rect 52x22 smd: 1(-40,40) 2(-40,-40) 3(40,0)
  silkscreen extent -4,-59 28,59, body extent -47,-57 47,57, height 45
WE-PD2SR_7850 [mm] "SMD Shielded Power Inductor, body 7.8x7.0mm"
  rect 3x7.5 smd: 1(-1272.5,-1270) 2(-1267.5,-1270)
  silkscreen extent -1274.62,-1273.65 -1269.3,-1266.35, body extent -1273.9,-1273.5 -1266.1,-1266.5, height 5

## Part data
C1 C4 C7 C8 C9: library part CMP-001-00121-1, "Capacitor SMD 0805 - Generic", Design Item ID=CAP_0805, Source=Generic_Schematic_Library.SchLib
C2 C3 C6 C24 C26 C28 C29: library part CL21B105KAFNNNE, "1 ÂµF Â±10% 25V Ceramic Capacitor X7R 0805 (2012 Metric)", Package="SMD-2 Samsung", Check_prices=https://www.snapeda.com/parts/CL21B105KAFNNNE/Samsung/view-part/?ref=eda, MF="Samsung Electro-Mechanics", MP=CL21B105KAFNNNE, SnapEDA_Link=https://www.snapeda.com/parts/CL21B105KAFNNNE/Samsung/view-part/?ref=snap
C18: library part CMP-08246-002111-1, "Cap Ceramic 10uF 35V X7R 10% Pad SMD 1206 +125°C Automotive T/R", Capacitance=10uF, Case Code (Imperial)=1206, Case Code (Metric)=3216, Dielectric=X7R, Max Operating Temperature=125°C, Min Operating Temperature=-55°C, Package Quantity=2000, Ratings=AEC-Q200, Tolerance=10%, Voltage Rating=35V, Case/Package=1206, Features="Soft Termination", Height=1.6mm, Lead Free="Lead Free", Length=0.126inch, Mount="Surface Mount", Packaging="Tape and Reel", REACH SVHC="No SVHC", Termination=SMD/SMT, Thickness=0.075inch, Voltage Rating (DC)=35V, Weight=0.000571oz, Width=0.063inch
C19 C20: library part CMP-06035-059468-1, "Ceramic Capacitor for Automotive 22uF ±10% 10VDC X7R 1206 Embossed T/R"
C21 C22 C30 C33 C36 C39 C42 C43 C44 C45 C46 C47 C48: library part CMP-03020-000950-1, "CAP CER 0.1UF 50V X7R 0805", Capacitance="0.10 μF", Manufacturer=KEMET, Manufacturer Part Number=C0805C104J5RACTU, Package=C0805C-DN, Temperature="-55°C to +125°C", Temperature Characteristic=X7R, Temperature Coefficient=30ppm/°C, Temperature Range High=+125°C, Temperature Range Low=-55°C, Tolerance=0.05, Voltage Rating="50 V", Automotive=No, Category=Cap, ComponentLink2Description=Datasheet, ComponentLink2URL=https://content.kemet.com/datasheets/KEM_C1003_C0G_SMD.pdf, Device Class L1="Passive Components", Device Class L2=Capacitors, Device Class L3="Ceramic Capacitors", Digikey Description="CAP CER 0.1UF 50V X7R 0805", Height=0.88mm, Ipc Land Pattern Name=CAPC200125X78, Lead Free=Yes, Material=Ceramic, Mouser Description="Multilayer Ceramic Capacitors MLCC - SMD/SMT 50volts 0.1uF X7R 5%", Octopart=https://octopart.com/c0805c104j5ractu-kemet-104634, RoHS=TRUE
C23: library part CMP-001-00010-9, "Chip Capacitor, 1 uF, +/-10%, 25 V, 0805 (2012 Metric)", Capacitor Type=Ceramic, Case/Package=0805, Max Operating Temperature=125°C, Min Operating Temperature=-55°C, Tolerance=10%, Voltage Rating=25V, Mounting Technology=SM, Pins=2, RoHS Compliant=True
C25 C27: library part GRM21BR71H105KA12L, "SMD Capacitor X7R(EIA) with Capacitance: 1.0uF Tol. 10%. Rated Voltage: 50Vdc", Package="805-2 Murata", Check_prices=https://www.snapeda.com/parts/GRM21BR71H105KA12L/Murata/view-part/?ref=eda, MF=Murata, MP=GRM21BR71H105KA12L, SnapEDA_Link=https://www.snapeda.com/parts/GRM21BR71H105KA12L/Murata/view-part/?ref=snap
C31 C32 C34 C35 C37 C38: library part GCM31CR71A226KE02K, "Capacitor GCM31 L=3.2mm W=1.6mm T=1.6mm", Manufacturer_Name="Murata Electronics", Mouser Part Number=81-GCM31CR71A226KE2K, Arrow Part Number=GCM31CR71A226KE02K, Arrow Price/Stock=https://www.arrow.com/en/products/gcm31cr71a226ke02k/murata-manufacturing?region=nac, Datasheet Link=https://search.murata.co.jp/Ceramy/image/img/A01X/G101/ENG/GCM31CR71A226KE02-01A.pdf, Geometry.Height=1.8mm, Manufacturer_Part_Number=GCM31CR71A226KE02K, Mouser Price/Stock=https://www.mouser.co.uk/ProductDetail/Murata-Electronics/GCM31CR71A226KE02K?qs=QzBtWTOodeVgM6QlH6X51g%3D%3D
C40 C41: library part CGA5L1X7R1V106K160AE, "10 ÂµF Â±10% 35V é™¶ç“·ç”µå®¹å™¨ X7R 1206ï¼ˆ3216 å…¬åˆ¶ï¼‰", Package="3216 TDK", Availability="In Stock", Check_prices=https://www.snapeda.com/parts/CGA5L1X7R1V106K160AE/TDK/view-part/?ref=eda, MF=TDK, MP=CGA5L1X7R1V106K160AE, Price=None, Purchase-URL=https://pricing.snapeda.com/search/part/CGA5L1X7R1V106K160AE/?ref=eda, SnapEDA_Link=https://www.snapeda.com/parts/CGA5L1X7R1V106K160AE/TDK/view-part/?ref=snap
D1 D2 D3: library part CMP-004-00077-1, "LED 1206 RED SMD", Design Item ID=LED_1206_RED, Source=Generic_Schematic_Library.SchLib
D4 D5 D6: library part SMBJ13A, "600W, 15.2V, 5%, Unidirectional, TVS", Package="SMD-2 Taiwan Semiconductor", Check_prices=https://www.snapeda.com/parts/SMBJ13A/taiwan/view-part/?ref=eda, MF="Taiwan Semiconductor Corporation", MP=SMBJ13A, SnapEDA_Link=https://www.snapeda.com/parts/SMBJ13A/taiwan/view-part/?ref=snap
D7: "600W, 15.2V, 5%, Unidirectional, TVS", Package="SMD-2 Taiwan Semiconductor", Check_prices=https://www.snapeda.com/parts/SMBJ13A/taiwan/view-part/?ref=eda, MF="Taiwan Semiconductor Corporation", MP=SMBJ13A, SnapEDA_Link=https://www.snapeda.com/parts/SMBJ13A/taiwan/view-part/?ref=snap
D8 D9 D10: library part BAT54C_215, "Schottky barrier diode,BAT54C 0.2A 30V NXP BAT54C,215, Dual SMT Schottky Diode, Common Cathode, 30V 200mA, 5ns, 3-Pin TO-236AB", Arrow Part Number=BAT54C,215, Manufacturer_Name=Nexperia, Mouser Part Number=771-BAT54C-T/R, Arrow Price/Stock=https://www.arrow.com/en/products/bat54c215/nexperia.html?utm_currency=USD&region=asia, Datasheet Link=https://assets.nexperia.com/documents/data-sheet/BAT54_SER.pdf, Geometry.Height=1.1mm, Manufacturer_Part_Number=BAT54C,215, Mouser Price/Stock=https://www.mouser.co.uk/ProductDetail/Nexperia/BAT54C215?qs=me8TqzrmIYV5SKKt13YKQA%3D%3D
D11 D13: library part BZX84-C4V7,215, Package=None, Availability=Unavailable, MF="{'manufacturer': u'Nexperia USA Inc.'}", MP=BZX84-C4V7,215, Price=None
D12 D14 D15 D16: library part BAT54A_215, "Diode Array 1 Pair Common Anode 30 V 200mA (DC) Surface Mount TO-236-3, SC-59, SOT-23-3", Arrow Part Number=BAT54A,215, Manufacturer_Name=Nexperia, Mouser Part Number=771-BAT54A-T/R, Arrow Price/Stock=https://www.arrow.com/en/products/bat54a215/nexperia.html?utm_currency=USD&region=europe, Datasheet Link=https://assets.nexperia.com/documents/data-sheet/BAT54A.pdf, Geometry.Height=1.1mm, Manufacturer_Part_Number=BAT54A,215, Mouser Price/Stock=https://www.mouser.co.uk/ProductDetail/Nexperia/BAT54A215?qs=me8TqzrmIYV%252BITv%2F8aeieg%3D%3D
G***: library part SDSLLOGO
J1: library part CMP-002-00170-1, "CONN HEADER SMD 12POS 1.25MM", Current Rating=1A, Housing Color=Natural, Max Operating Temperature=85°C, Min Operating Temperature=-25°C, Voltage Rating=50V, Contact Material=Bronze, Contact Plating=Tin, Design Item ID=7347c7e790388373890d2c5be27f0b5, Housing Material=Nylon, Lead Free="Lead Free", Mount="Surface Mount", Number Of Contacts=12, Number of Positions=12, Number Of Rows=1, Orientation=Straight, Packaging="Cut Tape", Pitch=1.25mm, Reach SVHC Compliant=Yes, Series=GH, Source="SquidSat Deployable Antenna REV1_1.SCHLIB", Termination=SMD/SMT, Voltage Rating (AC)=50V, Wire/Cable Gauge=26AWG
L1: library part CMP-1397-00011-3, "Fixed Ind 3.9UH 3.8A 20 Mohm SMD", Ambient Temperature Range High=85°C, Ambient Temperature Range Low=-40°C, Case/Package=SMD/SMT, Current Rating=3.8A, DC Resistance (DCR)=16.7mΩ, Inductance=3.9µH, Inductance Tolerance=30%, Max Operating Temperature=125°C, Saturation Current=4A, Self Resonant Frequency=45MHz, Test Frequency=100kHz, Composition=Wirewound, Core Material="Composite, Ferrite", Depth=7mm, Height=4.8mm, Height - Seated (Max)=4.4958mm, Length=7.8mm, Max DC Current=3.8A, Min Operating Temperature=-40°C, Mount="Surface Mount", Number of Pins=2, REACH SVHC=Unknown, RMS Current (Irms)=3.8A, RoHS=Compliant, Series Resistance=16.7mΩ, Shielding=Shielded, Termination=SMD/SMT, Tolerance=30%, Width=7mm
MH1 MH2 MH3 MH4: library part CMP-002-00076-1, "BOTTOM LEFT Mounting Hole for blank 1U CubeSat template used on CCNT"
P2: library part CMP-002-00166-1, "0.025\" SQ Post Header, Through-hole, Vertical, -55 to 125 degC, 2.54 mm Pitch, 2-Pin, Male, RoHS", Manufacturer=Samtec, PartNumber=TSW-102-26-F-S, Temperature Range="-55 to 125 degC", Available Preview Images=2D, ComponentLink1Description="Manufacturer URL", ComponentLink1URL=http://www.samtec.com, ComponentLink2Description=Datasheet, ComponentLink2URL=http://www.samtec.com/documents/webfiles/pdf/TSW_TH.PDF, ComponentLink3Description="Package Specification", ComponentLink3URL=http://www.samtec.com/documents/webfiles/cpdf/TSW-XXX-XX-XXX-X-XX-XXX-MKT.pdf, DatasheetVersion=F-214, Design Item ID=CMP-1024-00329-1, Mounting Technology=Through-hole, Orientation=Vertical, PackageDescription=".025[0.64] SQ. Post Terminal Strip Assembly", PackageReference=TSW-102-26-XX-S, PackageVersion="DM, 8/1988", Pitch="2.54 mm", RoHS=True, Source="SquidSat Deployable Antenna REV1_1.SCHLIB"
P3 P4: library part CMP-1502-01070-4, "THT Vertical Pin Header WR-PHD, Pitch 2.54 mm, Single Row, 6 pins", Color=Black, Contact Resistance=20mΩ, Current Rating=3A, Max Operating Temperature=105°C, Min Operating Temperature=-40°C, Operating Supply Voltage=250V, Connector Type="Male Pin", Contact Gender=Male, Contact Material=Gold, Contact Mating Length=5.9944mm, Contact Plating=Gold, Gender=Male, Height=8.89mm, Housing Material=PBT, Lead Free="Lead Free", Lead Pitch=2.54mm, Mount="Through Hole", Number Of Contacts=6, Number of Pins=6, Number of Positions=6, Number Of Rows=1, Orientation=Vertical, Packaging=Bulk, Pitch=2.54mm, RoHS=Compliant, Termination="Through Hole", Voltage Rating=250V
Q1 Q2 Q3 Q4: "N-Channel 60 V 115mA (Ta) 370mW (Ta) Surface Mount SOT-23-3", Package="SOT-23-3 Diodes Inc.", Availability="In Stock", Check_prices=https://www.snapeda.com/parts/2N7002-7-F/Diodes+Inc./view-part/?ref=eda, MF="Diodes Inc.", MP=2N7002-7-F, Price=None, Purchase-URL=https://pricing.snapeda.com/search/part/2N7002-7-F/?ref=eda, SnapEDA_Link=https://www.snapeda.com/parts/2N7002-7-F/Diodes+Inc./view-part/?ref=snap
R1 R2 R3 R4 R5 R6 R7 R8 R9 R10 R11 R12 R13 R14 R15 R16 R17 R18 R19 R20 R21 R22 R23 R24 R25 R26 R27 R28 R29 R30 R31 R32 R33 R34 R35 R36 R37 R38 R39 R40 R41 R42 R43 R44 R45 R46 R47 R48 R49 R50 R51 R52 R53 R54 R55 R56 R57 R58 R59 R60 R61 R62 R63 R64 R65 R66 R67 R68 R69 R70 R71: library part CMP-009-00183-1, "Resistor SMD 0805 - Generic", Design Item ID=RES_0805, Source=Generic_Schematic_Library.SchLib
SW1: "DIP Switches / SIP Switches", Manufacturer_Name=CTS, Mouser Part Number=774-2194MST, Arrow Part Number=219-4MST, Arrow Price/Stock=https://www.arrow.com/en/products/219-4mst/cts, Datasheet Link=https://componentsearchengine.com/Datasheets/1/219-4MST.pdf, Geometry.Height=4.3mm, Manufacturer_Part_Number=219-4MST, Mouser Price/Stock=https://www.mouser.co.uk/ProductDetail/CTS-Electronic-Components/219-4MST?qs=qNzHFtQhdJ8xGV2Z9mul9A%3D%3D
TP1 TP2 TP3 TP4 TP5: library part CMP-2000-05649-1, "Banana Jack, Non-Insulated, 1-Pin THD, RoHS, Bulk", Color=-, Manufacturer=Keystone-Electronics, Package Description="1-Pin Through Hole Device, Dia 7.92 mm", Package Version="Rev. B, 11/1994", Body Material=-, Category=Connectors,Interconnects, Contact Finish=Nickel, Contact Material=Brass, Datasheet URL=http://www.keyelco.com/product-pdf.cfm?p=2379, Datasheet Version="Rev. B, 11/1994", Family=BananaandTipConnectors-Jacks,Plugs, Features=-, Gender=Female, Insulation=Non-Insulated, Manufacturer URL=http://www.keyelco.com/, Mounting Technology=ThroughHole, Mounting Type=ThroughHole, Operating Temperature=-, Package Reference=575-4, Package URL=http://www.keyelco.com/product-pdf.cfm?p=2379, Packaging=Bulk, Plug/Mating Plug Diameter=StandardBanana, Series=-, Termination=Solder, Type=BananaJack, Wire Gauge=-
U1: library part CMP-204-000001-1, "Raspberry Pi Board, Arm Cortex-M0+; Core Architecture:Arm; Core Sub-Architecture:Cortex-M0+; Kit Contents:Raspberry Pi Pico Board; No. Of Bits:32Bit; Silicon Core Number:Rp2040; Silicon Manufacturer:Raspberry Pi", Package=None, Check_prices=https://www.snapeda.com/parts/RASPBERRY%20PI%20PICO/Raspberry+Pi/view-part/?ref=eda, Component Type=Standard, Design Item ID=RASPBERRY_PI_PICO, MF="Raspberry Pi", MP="RASPBERRY PI PICO", Pin Count=40, SnapEDA_Link=https://www.snapeda.com/parts/RASPBERRY%20PI%20PICO/Raspberry+Pi/view-part/?ref=snap, Source=RASPBERRY_PI_PICO.SchLib
U2: library part CMP-031-00060-1, "IC TRANSCEIVER 1/1 SOT23-8", Case/Package=SOT-23-8, Max Operating Temperature=125°C, Min Operating Temperature=-40°C, Component Type=Standard, Data Rate=1Mbps, Design Item ID=CMP-04872-000178-1, Lead Free="Lead Free", Mount="Surface Mount", Packaging="Tape and Reel", Pin Count=8, RoHS Compliant=Yes, Source="Squid FCR V0.SCHLIB"
U3 U5 U7 U8: library part CMP-019-00076-1, "2.7-V to 22-V, 56-mΩ, 4.5-A, power mux with seamless switchover 12-VQFN-HR -40 to 125", Max Operating Temperature=125°C, Max Supply Voltage=22V, Min Operating Temperature=-40°C, Min Supply Voltage=2.8V, Nominal Supply Current=300µA, Output Voltage=22V, Pins=12
U4: library part CMP-00008-1, "IC SW CURR LIMIT HI SIDE 8-MSOP / USB Power Switch Single 5.5V 0.1A to 1.5A 8-Pin MSOP T/R", Ambient Temperature Range High=85°C, Case/Package=MSOP, Current Rating=1.5A, Manufacturer Lifecycle Status=REL, Max Operating Temperature=125°C, Max Supply Voltage=5.5V, Min Operating Temperature=-40°C, Min Supply Voltage=2.7V, Nominal Supply Current=5µA, On-State Resistance=120mΩ, Country of Assembly=Thailand, Country of Fabrication="United States of America", Country of Origin=Thailand, Export Control Classification Number (ECCN) Code=EAR99, Fault Protection="Over Temperature", Harmonized Tariff Schedule (HTS) Code=8542.39.0060, Height=1.1mm, HS Code=8542.39.0090, Lead Free="Lead Free", Lifecycle Status=Production, Max Output Current=1.5A, Mounting Technology="Surface Mount", Nominal Supply Voltage=5.5V, Number of Channels=1, Number of Outputs=1, Output Configuration="High Side", Output Current=1.5A, Part Series=-, Pins=8, Projected EOL Date=2034-06-14, Radiation Hardening=No, RoHS=Compliant, Schedule B="8542390000, 8542390000", Turn-Off Delay Time=22µs, Turn-On Delay Time=2ms
U6: library part CMP-330-000002-1, "Stand-Alone CAN Controller With SPI Interface, 18-Pin SOIC, Extended Temperature", Code_JEDEC=MS-013, Component Type=Standard, ComponentLink1Description="Manufacturer URL", ComponentLink1URL=http://www.microchip.com/, ComponentLink2Description=Datasheet, ComponentLink2URL=http://ww1.microchip.com/downloads/en/DeviceDoc/21801f.pdf, ComponentLink3Description="Package Specification", ComponentLink3URL=http://www.microchip.com/stellent/groups/techpub_sg/documents/packagingspec/en012702.pdf, DatasheetVersion="revF, Oct-2010", Design Item ID=CMP-0186-00035-2, PackageDescription="18-Lead Plastic Small Outline (SO) - Wide 7.50mm Body [SOIC]", PackageReference=SOIC-SO18, PackageVersion="revBB, Aug-2009", Pin Count=18, RevisionNote="URLs added. DatasheetVersion updated.", Source="Squid FCR V0.SCHLIB"
U9: "150-mA 24-V ultra-low-IQ low-dropout (LDO) voltage regulator", Package="SOT-23-5 Texas Instruments", Check_prices=https://www.snapeda.com/parts/TLV70433DBVR/Texas+Instruments/view-part/?ref=eda, MF="Texas Instruments", MP=TLV70433DBVR, SnapEDA_Link=https://www.snapeda.com/parts/TLV70433DBVR/Texas+Instruments/view-part/?ref=snap
U10: library part LM4040BIM3-2.5_NOPB, "100-ppm/C precision micropower shunt voltage reference", Arrow Part Number=LM4040BIM3-2.5/NOPB, Manufacturer_Name="Texas Instruments", Mouser Part Number=926-LM4040BIM325NOPB, Arrow Price/Stock=https://www.arrow.com/en/products/lm4040bim3-2.5nopb/texas-instruments, Datasheet Link=https://datasheet.datasheetarchive.com/originals/distributors/Datasheets-DGA16/867642.pdf, Geometry.Height=1.12mm, Manufacturer_Part_Number=LM4040BIM3-2.5/NOPB, Mouser Price/Stock=https://www.mouser.co.uk/ProductDetail/Texas-Instruments/LM4040BIM3-2.5-NOPB?qs=QbsRYf82W3GDmxxHwxXlYw%3D%3D
U13: library part CMP-12757-000006-1, "IC REG BUCK 3.3V 2A TSOT26", Ambient Temperature Range High=+85°C, Ambient Temperature Range Low=-40°C, Manufacturer="Diodes Inc.", Max Junction Temp=+160°C, Max Supply Voltage=32V, Min Supply Voltage=3.8V, Nominal Supply Current=22uA, Output Current=2A, Output Voltage=3.3V, Package=TSOT26, Switching Frequency=1.1MHz, Temperature="to +160°C", Automotive=No, Category=IC, ComponentLink2Description=Datasheet, ComponentLink2URL=https://www.diodes.com/assets/Datasheets/AP63200-AP63201-AP63203-AP63205.pdf, Device Class L1="Integrated Circuits (ICs)", Device Class L2="Power Management ICs", Device Class L3="Voltage Regulators - Switching", Digikey Description="IC REG BUCK 3.3V 2A TSOT26", Footprint Url=https://www.diodes.com/assets/Package-Files/TSOT26.pdf, Height=1mm, Lead Free=Yes, Manufacturer Part Number=AP63203WU-7, Mouser Description="AP63203 Series 3.3 V 2 A SMT Fixed Low IQ Synchronous Buck - TSOT-26", Number of Outputs=1, Octopart=https://octopart.com/ap63203wu-7-diodes+inc.-98099550, Output Type=Fixed, RoHS=TRUE, Standoff Height=0.01mm, Switching Topology=Buck, Temperature Range High=+160°C
U14 U15 U16 U17: "eFuse, 2.7-19 V, 0.125-2 A adjustable current limit, 89 mOhm, OV clamp, auto-retry, HSOIC-8", Case/Package="HSOIC-8 (DDA)", Current Rating=2A, Manufacturer="Texas Instruments", Max Supply Voltage=19V, Min Supply Voltage=2.7V, On-State Resistance=120mΩ, Datasheet=https://www.ti.com/lit/ds/symlink/tps2596.pdf, Height=1.7mm, Manufacturer Part Number=TPS259621DDAR, Pins=8
Y1: library part CMP-003-00073-1, "Crystal 16MHz, 30ppm, 22pF, 60O", ESR (Equivalent Series Resistance)=80, Frequency=16MHz, Frequency Stability=30ppm, Load Capacitance=22pF, Max Operating Temperature=85°C, Min Operating Temperature=-40°C, Component Type=Standard, Design Item ID=CMP-18717-000072-1, Frequency Tolerance=30ppm, Pins=4, Source="Squid FCR V0.SCHLIB"

## Via types
v1: diameter 20.47, hole 9.84, Top Layer to Bottom Layer, 16 vias

## Nets (pads, with @x,y where several pads share a name; then routed paths per layer and width w, separated by ;. In a path a pad name is that pad's centre, name@x,y a point inside that pad or via, vN(x,y) a via of type N, cw(c..) or ccw(c..) an arc to the next point about the centre after c; other vN are vias at no path point)
+3V3_AUX: C28.1 R13.1 R17.2 R26.2 R38.2 R41.2 R44.2 R47.2 U9.3
+3V3_LIM: C6.1 U3.7 U14.5
  other v1: -771.65,-1379.87
+3V3_PSU: C45.1 D4.C D8.1 R14.1 R20.1 R58.1 TP3.1 U14.4
+3V3_RPI: C1.2 C9.2 R10.2 U1.3V3 U2.3 U6.18
+3V3_TGT: C31.1 C32.1 J1.1 P3.1 R50.1 U3.1 U3.8
  other v1: -803.15,-1352.31 -771.65,-1352.31
+3V3_USB: C19.1 C20.1 C26.1 L1.2 R18.1 U3.2 U13.1
  other v1: -803.15,-1379.87
+5V_LIM: C2.1 U5.7 U15.5
  other v1: 826.77,-742.07
+5V_PSU: C46.1 D5.C D8.2 R23.1 R29.1 R61.1 TP1.1 U15.4
+5V_RF_LIM: C24.1 U7.7 U16.5
  other v1: 874.02,-2419.24
+5V_RF_PSU: C47.1 D6.C D9.1 R32.1 R65.1 TP4.1 U16.4
+5V_RF_TGT: C37.1 C38.1 J1.4 P3.4 U7.1 U7.8
  other v1: 842.52,-2391.68 874.02,-2391.68
+5V_TGT: C34.1 C35.1 J1.2 P3.2 R52.1 U5.1 U5.8
  other v1: 795.28,-714.52 826.77,-714.52
+12V_LIM: C25.1 U8.7 U17.5
  other v1: -830.71,-2419.24
+12V_PSU: C48.1 D7.C D9.2 R35.1 R69.1 TP2.1 U17.4
+12V_TGT: C40.1 C41.1 J1.3 P3.3 R54.1 U8.1 U8.8
  other v1: -862.2,-2391.68 -830.71,-2391.68
+VBUS: C23.1 D10.1 D10.2 R3.2 U1.VBUS U4.1 U4.7
+VBUS_PROT: C3.1 C4.2 C18.1 C22.1 R27.1 U4.6 U4.8 U5.2 U13.2 U13.3
  other v1: 795.28,-742.07
ADC_3V3: C42.1 R50.2 R51.1 U1.GP26_A0
ADC_5V: C43.1 R52.2 R53.1 U1.GP27_A1
ADC_12V: C44.1 R54.2 R55.1 U1.GP28_A2
CAN_H: J1.7 P4.6 U2.7
CAN_INT: U1.GP20 U6.12
CAN_L: J1.8 P4.5 U2.6
CAN_OSC_1: C8.2 U6.8 Y1.3
CAN_OSC_2: C7.2 U6.7 Y1.1
CAN_RST: R10.1 U1.GP21 U6.17
CAN_RX: U2.4 U6.2
CAN_S: R1.2 U1.GP6 U2.8
CAN_SHDN: U1.GP7 U2.5
CAN_SPI_CS: U1.GP13 U6.16
CAN_SPI_MISO: U1.GP12 U6.15
CAN_SPI_MOSI: U1.GP11 U6.14
CAN_SPI_SCK: U1.GP10 U6.13
CAN_TX: U2.1 U6.1
DIS_3V3: D12.3 Q1.3 R38.1 SW1.1
DIS_5V: D14.3 Q2.3 R41.1 SW1.2
DIS_5VRF: D15.3 Q3.3 R44.1 SW1.3
DIS_12V: D16.3 Q4.3 R47.1 SW1.4
EN_3V3: R39.1 U1.GP16
EN_5V: R42.1 U1.GP17
EN_5VRF: R45.1 U1.GP18
EN_12V: R48.1 U1.GP19
EN_LIM_3V3: R58.2 R59.1 U14.3
EN_LIM_5V: R61.2 R62.1 U15.3
EN_LIM_5VRF: R65.2 R66.1 U16.3
EN_LIM_12V: R69.2 R70.1 U17.3
G_3V3: Q1.1 R39.2 R40.1
G_5V: Q2.1 R42.2 R43.1
G_5VRF: Q3.1 R45.2 R46.1
G_12V: Q4.1 R48.2 R49.1
GND: C1.1 C2.2 C3.2 C4.1 C6.2 C7.1 C8.1 C9.1 C18.2 C19.2 C20.2 C22.2 C23.2 C24.2 C25.2 C26.2 C27.2 C28.2 C29.2 C30.2 C31.2 C32.2 C33.2 C34.2 C35.2 C36.2 C37.2 C38.2 C39.2 C40.2 C41.2 C42.2 C43.2 C44.2 C45.2 C46.2 C47.2 C48.2 D2.K D3.K D4.A D5.A D6.A D7.A D11.1 D13.1 J1.5 J1.6 J1.13 J1.14 MH1.MH1 MH2.MH1 MH3.MH1 MH4.MH1 P3.5 P3.6 Q1.2 Q2.2 Q3.2 Q4.2 R1.1 R5.2 R15.2 R19.2 R21.2 R22.2 R24.2 R28.2 R30.2 R31.2 R33.2 R34.2 R36.2 R37.2 R40.2 R43.2 R46.2 R49.2 R51.2 R53.2 R55.2 R59.2 R60.2 R62.2 R63.2 R64.2 R66.2 R67.2 R68.2 R70.2 R71.2 SW1.5 SW1.6 SW1.7 SW1.8 TP5.1 U1.AGND U1.GND U1.GND2 U1.GND3 U1.GND4 U1.GND5 U1.GND6 U1.GND7 U2.2 U3.12 U4.3 U5.12 U6.9 U7.2 U7.3 U7.4 U7.6 U7.9 U7.12 U8.2 U8.3 U8.4 U8.6 U8.9 U8.12 U9.1 U10.2 U10.3 U13.4 U14.1 U14.8 U15.1 U16.1 U17.1 Y1.2 Y1.4
  other v1: -862.2,-2419.24 842.52,-2419.24
ILM_3V3: R22.1 U3.10
ILM_5V: R31.1 U5.10
ILM_5VRF: R34.1 U7.10
ILM_12V: R37.1 U8.10
ILM_LIM_3V3: R60.1 U14.7
ILM_LIM_5V: R63.1 U15.7
ILM_LIM_5VRF: R67.1 U16.7
ILM_LIM_12V: R71.1 U17.7
MCU_RESET: J1.12 P4.1 R8.2
NetC21_1: C21.1 U13.6
NetC21_2: C21.2 L1.1 U13.5
NetD1_A: D1.A R3.1
NetD1_K: D1.K U4.2
NetD2_A: D2.A R6.1
NetD3_A: D3.A R7.1
NetR5_1: R5.1 U4.5
OV1_3V3: D12.2 R20.2 R21.1 U3.5
OV1_5V: D14.2 R29.2 R30.1 U5.5
OV1_5VRF: D15.1 R32.2 R33.1 U7.5
OV1_12V: D16.1 R35.2 R36.1 U8.5
OV2_3V3: D12.1 R18.2 R19.1 U3.4
OV2_5V: D14.1 R27.2 R28.1 U5.4
OVC_5V: R64.1 U15.8
OVC_5VRF: R68.1 U16.8
PICO_MCU_RESET: R8.1 U1.GP4
PICO_ST_3V3: R56.2 U1.GP14
PICO_ST_5V: R57.2 U1.GP15
PICO_SWCLK: R2.1 U1.GP2
PICO_SWDIO: R4.1 U1.GP3
PICO_SWO: R9.1 U1.GP5
PICO_UART_RX: R12.1 U1.GP9
PICO_UART_TX: R11.1 U1.GP8
PR1_3V3: D11.3 R14.2 R15.1 R16.1 U3.6
PR1_5V: D13.3 R23.2 R24.1 R25.1 U5.6
SS_3V3: C30.1 U3.11
SS_5V: C33.1 U5.11
SS_5VRF: C36.1 U7.11
SS_12V: C39.1 U8.11
ST_3V3: R16.2 R17.1 R56.1 U3.9
ST_5V: R25.2 R26.1 R57.1 U5.9
SWCLK: J1.10 P4.3 R2.2
SWDIO: J1.11 P4.2 R4.2
SWO: J1.9 P4.4 R9.2
UART_RX: P2.2 R7.2 R12.2
UART_TX: P2.1 R6.2 R11.2
VAUX: C27.1 D8.3 D9.3 D10.3 U9.2
XREF_2V5: C29.1 R13.2 U3.3 U5.3 U10.1
pads on no net: D11.2 D13.2 D15.2 D16.2 U1.3V3_EN U1.ADC_VREF U1.GP0 U1.GP1 U1.GP22 U1.RUN U1.VSYS U4.4 U6.3 U6.4 U6.5 U6.6 U6.10 U6.11 U9.4 U9.5 U14.2 U14.6 U15.2 U15.6 U16.2 U16.6 U17.2 U17.6 U17.8

## Silkscreen, mask and mechanical layers (free items; w line width, h text height)
Top Overlay:
  drawing of 2489 lines, arcs and shapes, not listed
  text "+3.3V" at -1050,-41.29 h59.06
  text "+5V" at 838.58,-41.29 h59.06
  text "TX RX" at -725.68,-389.7 h51.18
  text "GND" at -80.71,-1948.77 h59.06
  text "+12V" at -1020.47,-2104.28 h59.06
  text "+5V RF" at 750,-2104.28 h59.06
  text "GND" at 315,-2613.94 h30 r90
  text "MCU_RST" at -687.5,-2619.94 h30 r90
  text "SWDIO" at -587.5,-2619.94 h30 r90
  text "SWCLK" at -487.5,-2619.94 h30 r90
  text "SWO" at -387.5,-2619.94 h30 r90
  text "CAN_L" at -284.75,-2619.94 h30 r90
  text "CAN_H" at -187.5,-2619.94 h30 r90
  text "GND" at 215,-2619.94 h30 r90
  text "5V RF" at 412.5,-2619.94 h30 r90
  text "12V" at 513.03,-2619.94 h30 r90
  text "5V" at 612.5,-2619.94 h30 r90
  text "3.3V" at 712.5,-2619.94 h30 r90
Bottom Overlay:
  drawing of 4040 lines, arcs and shapes, not listed
  text "Squid Debugger V1 / Bjorn Bengtsson & Alex Jaber" at -70.87,-3252.7 h39.37 r270